# Altium PCB IOT_Speaker-PCB-v1.3.PcbDoc (part 3 of 3)
Units mm, origin at the board's own origin, x right, y up, seen from the top; angles counter-clockwise.
Board outline 61.96 x 67.79 mm, 2 copper layers (Top Layer, Bottom Layer), stack 1.57 mm thick; 111 components, 61 nets, 362 pads, 148 vias.
Unrouted connection lines stored in the file: 20.
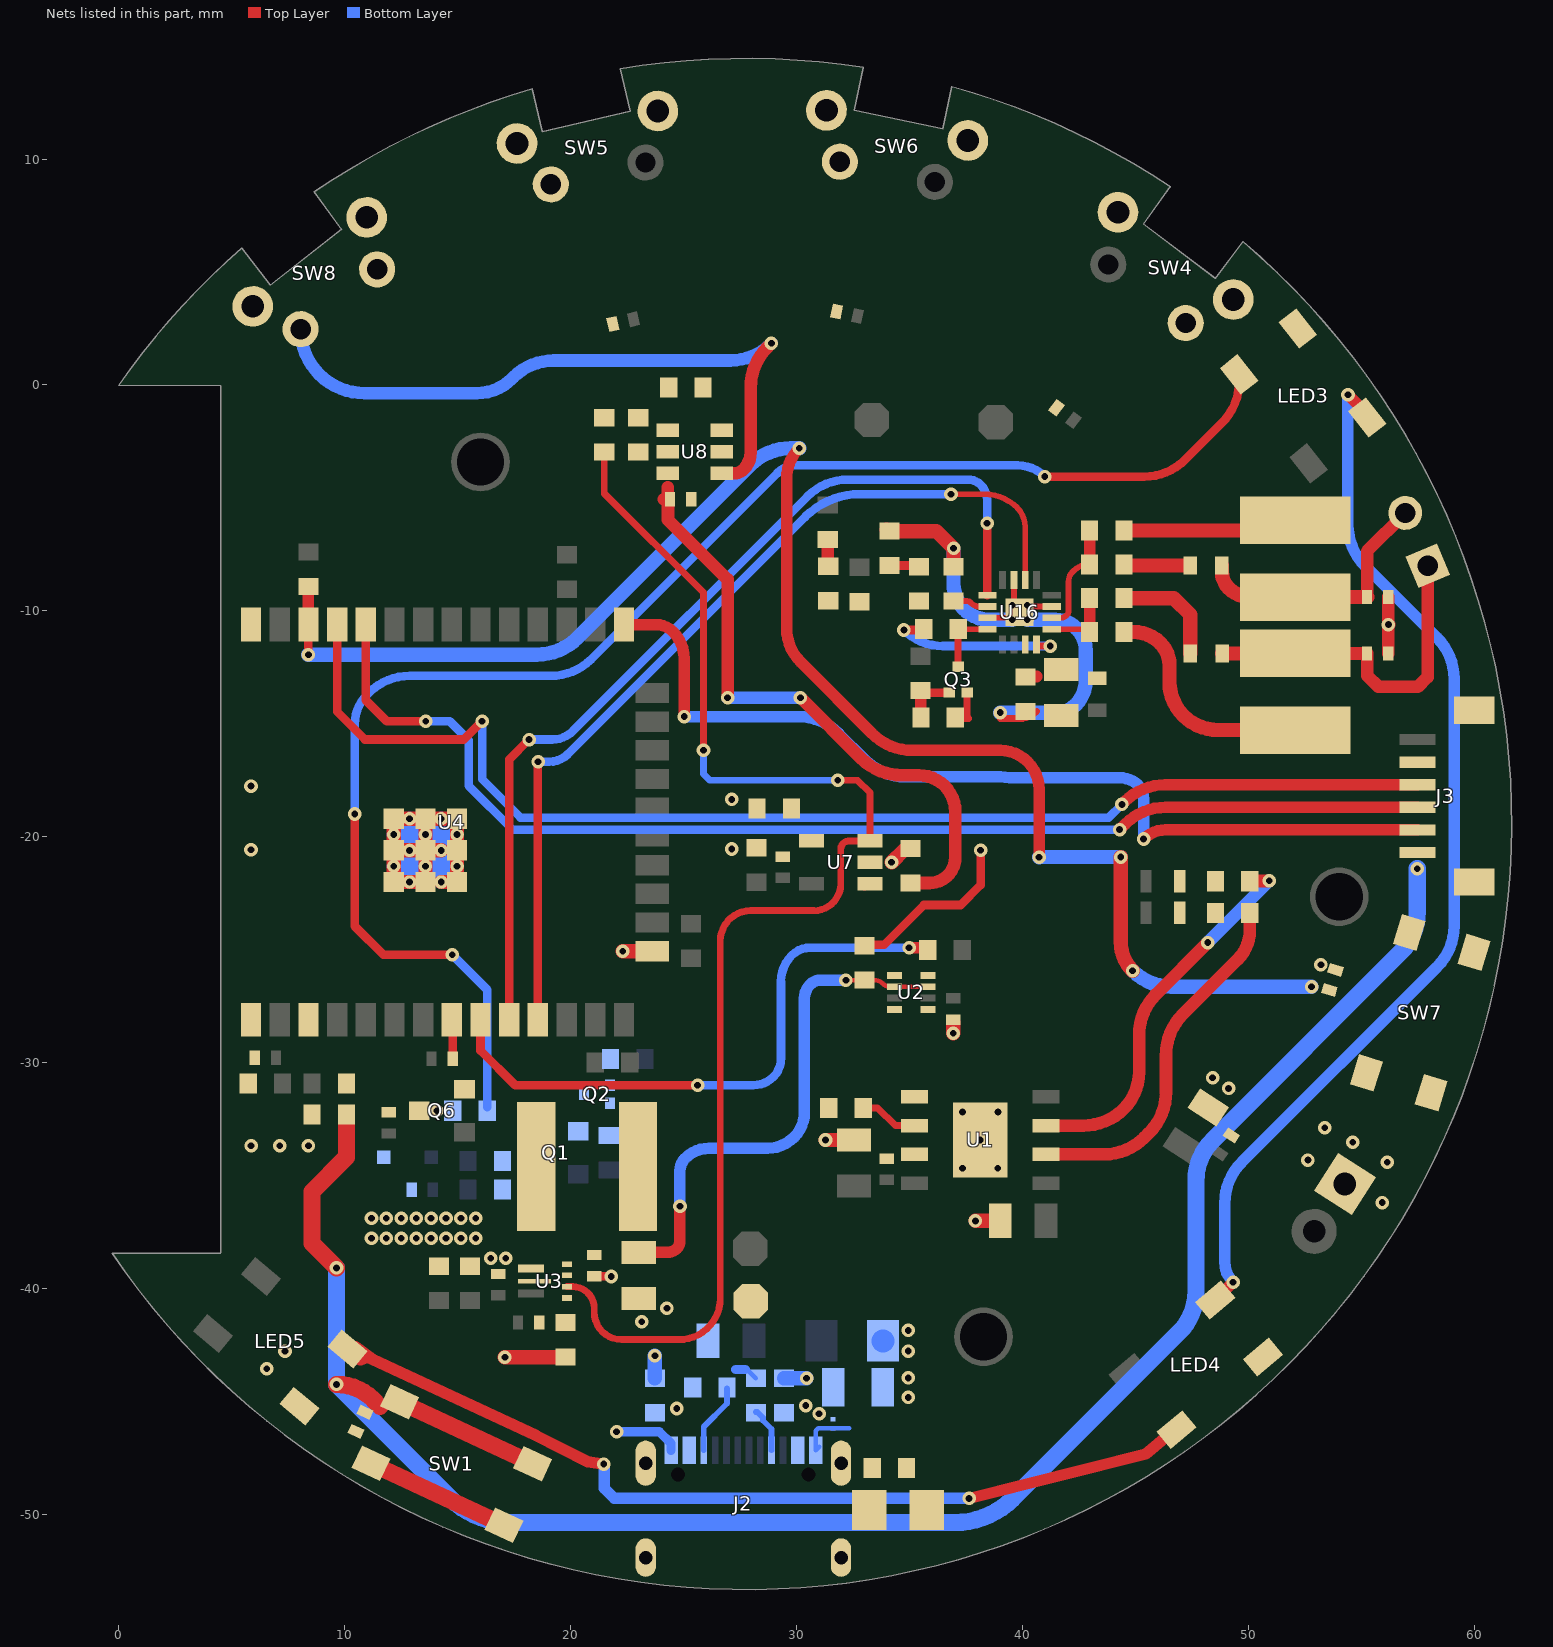
[diagram p2: the nets of this part, all layers, seen from the top]

## Via types
v1: diameter 0.6, hole 0.3, Top Layer to Bottom Layer, tented both sides, 130 vias
v2: diameter 0.6, hole 0.3, Top Layer to Bottom Layer, 18 vias

## Nets (pads, with @x,y where several pads share a name; then routed paths per layer and width w, separated by ;. In a path a pad name is that pad's centre, name@x,y a point inside that pad or via, vN(x,y) a via of type N, cw(c..) or ccw(c..) an arc to the next point about the centre after c; other vN are vias at no path point) (continued)
BUTTON_4: C22.1 R22.1 SW7.1 SW7.2 U4.36 | length 71.1
  Top Layer w0.381: v1(8.389,-11.939) U4.36@8.389,-10.608
  Top Layer w0.508: U4.36@8.39,-10.605 R22.1@8.389,-8.917 ; v1(30.12,-2.799) ccw(c31.461,-4.14) v1(30.12,-2.799) ccw(c31.461,-4.14) 29.565,-4.14 29.565,-10.77 ccw(c31.685,-10.77) 30.185,-12.269 33.353,-15.437 ccw(c35.149,-13.641) 35.149,-16.181 39.023,-16.181 cw(c39.023,-17.899) 40.742,-17.899 v1(40.742,-20.904)
  Top Layer w0.635: U4.36@8.389,-10.608 U4.36@8.391,-10.606 ; v1(44.355,-20.901) 44.355,-24.663 ccw(c46.152,-24.663) v1(44.882,-25.933)
  Bottom Layer w0.635: v1(8.389,-11.939) 18.505,-11.939 ccw(c18.505,-9.399) 20.301,-11.195 27.953,-3.543 cw(c29.749,-5.339) 29.749,-2.799 v1(30.12,-2.799) ; v1(40.742,-20.904) 40.745,-20.901 v1(44.355,-20.901) ; v1@44.883,-25.934 ccw(c46.586,-24.23) 46.586,-26.639 v1(52.803,-26.639)
CHRG: R4.2 U1.7 | length 17.1
  Top Layer w0.559: U1.7@41.041,-32.793 42.694,-32.793 ccw(c42.694,-30.253) 44.49,-32.049 ccw(c42.852,-30.411) 45.168,-30.411 45.168,-28.782 cw(c47.708,-28.782) 45.912,-26.986 v1(48.209,-24.689) ; R4.2@50.031,-21.96 v1@50.929,-21.96
  Bottom Layer w0.559: v1(48.209,-24.689) 48.209,-24.681 50.929,-21.961 v1(50.929,-21.953)
DATA_IN: U4.10 U16.1 | length 42.4
  Top Layer w0.381: U4.10@17.281,-28.106 17.281,-16.578 v1(18.161,-15.697) ; v1(38.437,-6.123) 38.444,-6.129 38.444,-9.303 U16.1@38.45,-9.309
  Bottom Layer w0.381: v1(18.161,-15.697) 19.191,-15.697 ccw(c19.191,-14.424) 20.091,-15.325 ; 20.092,-15.324 30.482,-4.934 cw(c32.278,-6.73) 32.278,-4.19 37.6,-4.19 cw(c37.6,-4.979) 38.158,-4.421 cw(c37.483,-5.095) 38.437,-5.095 v1(38.437,-6.123)
DETECTION: R6.2 U2.8 U4.9 | length 26.8
  Top Layer w0.381: U4.9@16.011,-28.106 16.011,-29.466 17.545,-31 v1(25.622,-31)
  Top Layer w0.508: v1(34.983,-24.919) 35.807,-24.919 R6.2@35.815,-24.911
  Bottom Layer w0.381: v1(25.622,-31) 28.093,-31 ccw(c28.093,-29.744) 28.981,-30.632 ccw(c28.184,-29.835) 29.312,-29.835 29.312,-26.413 cw(c30.959,-26.413) 29.794,-25.248 cw(c30.608,-26.061) 30.608,-24.911 34.975,-24.911 v1(34.983,-24.919)
DIN: Q6.2 R26.2 U4.8 | length 2
  Top Layer w0.203: U4.8@14.741,-28.106 U4.8@14.779,-28.144
  Top Layer w0.381: U4.8@14.741,-28.106 U4.8@14.741,-27.806 ; R26.2@14.779,-29.824 U4.8@14.779,-28.144
DIN#: LED3.4 R28.2 | length 67.8
  Top Layer w0.381: v1(10.446,-18.994) 10.446,-23.959 11.709,-25.222 v1(14.759,-25.222) ; v1(40.991,-4.057) 45.404,-4.057 ccw(c45.404,-1.517) 47.2,-3.313 48.849,-1.663 ccw(c47.053,0.133) 49.593,0.133 LED3.4@49.593,0.47
  Bottom Layer w0.381: v1(10.446,-18.994) 10.446,-15.005 cw(c12.268,-15.005) 10.98,-13.717 11.074,-13.623 cw(c12.87,-15.419) 12.87,-12.879 19.123,-12.879 ccw(c19.123,-10.339) 20.919,-12.135 29.159,-3.895 cw(c29.97,-4.705) 29.97,-3.559 39.79,-3.559 cw(c39.79,-5.258) v1(40.991,-4.057) ; v1(14.759,-25.222) 16.309,-26.772 R28.2@16.309,-31.978
DOUT1: LED3.2 LED4.4 | length 47.8
  Top Layer w0.508: LED4.4@48.492,-40.468 cw(c46.699,-42.267) 48.495,-40.471 LED4.4@48.537,-40.513 v1@49.303,-39.748 ; v1(54.416,-0.428) 55.163,-1.175 cw(c54.901,-1.438) LED3.2@55.272,-1.438 LED3.2@55.389,-1.555
  Bottom Layer w0.508: v1(49.328,-39.722) cw(c50.209,-38.841) 48.963,-38.841 48.963,-36.213 cw(c51.503,-36.213) 49.707,-34.417 58.368,-25.756 ccw(c56.572,-23.96) 59.112,-23.96 59.112,-12.997 ccw(c56.572,-12.997) 58.368,-11.201 55.16,-7.992 cw(c56.956,-6.196) 54.416,-6.196 v1(54.416,-0.428)
DOUT2: LED4.2 LED5.4 | length 40.9
  Top Layer w0.508: LED5.4@10.53,-42.969 LED5.4@10.12,-42.686 10.474,-42.581 11.216,-43.131 11.218,-43.133 ; 10.695,-43.168 11.031,-43.046 11.218,-43.133 ; 11.221,-43.135 11.218,-43.133 ; v1(21.463,-47.777) 20.759,-47.677 18.457,-46.508 11.218,-43.133 ; v1(37.643,-49.295) 45.463,-47.322 46.41,-46.528 LED4.2@46.828,-46.255
  Bottom Layer w0.508: v1(21.463,-47.777) 21.481,-47.795 21.481,-48.836 21.939,-49.295 v1(37.643,-49.295)
ENA: C14.2 C15.2 J3.6 R18.1 SW1.3 SW1.4 U4.3 | length 89.4
  Top Layer w0.508: U4.3@8.391,-28.106 U4.3@8.4,-28.097
  Top Layer w0.762: v1(9.634,-39.089) 8.547,-38.002 8.547,-35.716 10.071,-34.192 C14.2@10.071,-32.297 ; v1@9.635,-44.248 cw(c9.634,-46.547) 11.259,-44.921 11.561,-45.223 ; SW1.4@12.399,-44.992 SW1.4@12.427,-45.02 SW1.3@18.319,-47.767
  Bottom Layer w0.762: v1(9.634,-39.089) v1(9.634,-44.248) 14.681,-49.295 ccw(c17.271,-46.705) 17.271,-50.368 36.997,-50.368 ccw(c36.997,-46.705) 39.588,-49.295 46.939,-41.944 ccw(c45.143,-40.148) 47.683,-40.148 47.683,-35.233 cw(c50.223,-35.233) 48.427,-33.437 56.743,-25.121 ccw(c54.947,-23.325) 57.487,-23.325 v1(57.487,-21.413)
ENABLE: R10.2 U3.5 U7.3 | length 60.8
  Top Layer w0.305: U3.5@19.844,-39.922 20.093,-39.922 cw(c20.093,-40.873) 21.044,-40.873 21.044,-41.053 ccw(c22.257,-41.053) 22.257,-42.267 24.797,-42.267 ccw(c24.797,-40.438) 26.626,-40.438 26.626,-24.616 cw(c27.967,-24.616) 27.967,-23.275 30.772,-23.275 ccw(c30.772,-22.086) 31.575,-22.962 ccw(c30.772,-22.086) 31.826,-22.635 ccw(c30.772,-22.086) 31.96,-22.086 31.96,-20.562 cw(c32.339,-20.562) 32.339,-20.184 U7.3@33.26,-20.184 33.26,-18.051 32.71,-17.501 v1(31.826,-17.501) ; R10.2@21.488,-2.972 21.488,-4.8 25.883,-9.194 v1(25.883,-16.176)
  Bottom Layer w0.305: v1(25.883,-16.176) 25.883,-17.222 26.161,-17.501 v1(31.826,-17.501)
GAIN: R36.1 R37.1 R38.1 R39.1 U16.2 | length 1.8
  Top Layer w0.254: R36.1@36.954,-9.567 37.553,-9.567 cw(c37.553,-9.775) 37.701,-9.628 37.729,-9.656 ccw(c38.099,-9.287) 38.099,-9.809 U16.2@38.45,-9.809
  Top Layer w0.381: R38.1@31.264,-9.592 cw(c31.326,-9.654) R38.1@31.326,-9.567
  Top Layer w0.508: R38.1@31.407,-9.551 ccw(c31.507,-9.451) R38.1@31.507,-9.592 ; R37.1@32.788,-9.592 cw(c32.85,-9.654) R37.1@32.85,-9.567
GND: C1.1 C2.1 C3.1 C4.2 C5.1 C6.1 C7.1 C9.1 C10.1 C11.1 C12.2 C13.1 C14.1 C15.1 C16.1 C17.1 C18.1 C19.2 C20.1 C21.2 C22.2 C23.1 C24.2 C25.1 C26.1 C74.1 C75.1 C76.1 C77.1 C78.1 C79.1 C83.1 C102.1 C103.1 D1.2 D2.1 J1.1 J2.A1/B12 J2.B1/A12 J3.2 J3.MP1 J3.MP2 LED3.3 LED4.3 LED5.3 P3.1 Q2.2 Q3.2 R1.1 R2.1 R5.1 R8.1 R12.2 R36.2 R54.1 R66.2 R69.1 SW1.1 SW1.2 SW4.1 SW4.SH1 SW4.SH2 SW5.2 SW5.SH1 SW5.SH2 SW6.2 SW6.SH1 SW6.SH2 SW7.3 SW7.4 SW8.1 SW8.SH1 SW8.SH2 U1.1 U1.3 U1.9 U2.1 U2.4 U2.5 U3.1 U3.6 U4.1 U4.15 U4.38 U4.39 U4.39_16 U4.40 U4.41 U4.42 U4.43 U4.44 U4.45 U4.46 U4.47 U7.2 U8.2 U8.3 U16.3 U16.11 U16.15 U16.17 | length 86
  Top Layer w0.254: U16.3@38.45,-10.309 U16.17@39.555,-10.309 ; U16.17@39.625,-9.456 U16.15@39.625,-8.634 ; U16.17@40.478,-9.809 U16.11@41.3,-9.809
  Top Layer w0.305: R12.2@37.03,-14.774 37.624,-14.774 cw(c37.787,-14.611) 37.557,-14.611 Q3.2@37.557,-13.622 ; v1@39.021,-14.774 39.84,-14.774 ccw(c39.84,-13.646) 40.637,-14.444 ; U16.17@39.504,-9.755 cw(c39.504,-9.915) 39.617,-9.801 U16.17@39.875,-10.059
  Top Layer w0.381: C18.1@21.038,-39.46 21.044,-39.466 21.787,-39.466 v1(21.793,-39.472) ; C74.1@33.046,-24.79 33.876,-24.79 35.644,-23.022 37.27,-23.022 38.151,-22.141 v1@38.151,-20.599
  Top Layer w0.508: C74.1@33.01,-24.826 C74.1@33.046,-24.79
  Top Layer w0.559: C10.1@56.202,-11.888 56.202,-10.649 56.232,-10.619 56.232,-10.597 56.202,-10.567 C11.1@56.202,-9.389
  Top Layer w0.635: U4.39_16@14.271,-22.006 U4.45@14.971,-22.006 U4.39_16@14.971,-21.306 U4.47@14.971,-19.206 U4.39_16@14.271,-19.206 U4.44@13.571,-19.206 ; U4.39_16@14.271,-20.606 U4.43@13.571,-20.606 ; v1(17.089,-43.046) R8.1@19.751,-43.046 ; v1@22.301,-25.066 U4.15@23.611,-25.066 ; v1(31.284,-33.428) C5.1@32.544,-33.428 ; R66.2@33.982,-6.404 34.046,-6.468 36.192,-6.468 v1(36.954,-7.23) R36.2@36.954,-8.043 ; v1(34.212,-21.134) 34.758,-20.588 34.975,-20.588 C75.1@35.038,-20.524 ; v1(36.936,-28.702) C7.1@36.936,-28.213 ; v1(37.922,-37.009) C6.1@39.021,-37.009 ; U4.40@12.171,-20.606 U4.43@13.571,-20.606 ; U4.40@12.171,-20.606 U4.41@12.171,-19.206 U4.44@13.571,-19.206 ; U4.40@12.171,-20.606 U4.39@12.171,-22.006 U4.39_16@12.871,-22.006 U4.42@13.571,-22.006 U4.43@13.571,-20.606 ; U4.43@13.571,-20.606 U4.44@13.571,-19.206
  Top Layer w0.762: SW1.1@11.16,-47.739 SW1.2@17.051,-50.486
  Bottom Layer w0.203: 27.734,-43.508 R1.1@28.201,-43.976 ; J2.A1/B12@31,-47.013 J2.A1/B12@30.848,-47.166 30.848,-46.303 30.967,-46.184 32.344,-46.184
  Bottom Layer w0.406: v1(22.035,-46.342) 23.922,-46.342 24.448,-46.868 J2.B1/A12@24.448,-47.166 ; 27.313,-43.584 27.734,-43.584
  Bottom Layer w0.635: U4.39_16@12.171,-21.306 12.871,-21.306 ; U4.39_16@12.171,-19.906 12.871,-19.906 ; U4.39_16@12.871,-22.006 12.871,-21.306 ; U4.39_16@12.871,-19.206 12.871,-19.906 ; U4.39_16@14.271,-22.006 14.271,-21.306 14.271,-19.906 ; U4.39_16@14.271,-19.206 14.271,-19.906 ; U4.39_16@14.971,-21.306 12.871,-21.306 ; U4.39_16@14.971,-19.906 14.271,-19.906 ; C4.2@23.731,-43.976 v1(23.731,-42.978) ; C12.2@29.446,-43.976 v1(30.446,-43.976) ; v1(36.954,-7.23) 36.954,-8.8 ccw(c38.545,-8.8) 38.474,-10.39 v1(39.555,-10.39) ; v1(39.021,-14.505) 41.552,-14.505 ccw(c41.552,-13.377) 42.349,-14.174 ccw(c41.245,-13.071) 42.806,-13.071 42.806,-11.732 ccw(c41.467,-11.732) 42.414,-10.785 ccw(c41.46,-11.739) 41.46,-10.39 v1(40.215,-10.39) ; 12.871,-21.306 U4.39_16@12.871,-20.606 12.871,-19.906 ; 12.871,-19.906 14.271,-19.906
  other v1: 6.543,-43.551 7.352,-42.785 23.146,-41.479 24.264,-40.873 55.938,-36.196 37.352,-34.681 38.913,-34.681 56.154,-34.414 52.643,-34.319 5.851,-33.682 7.121,-33.682 8.391,-33.682 54.63,-33.525 38.132,-33.428 53.386,-32.89 37.345,-32.183 38.92,-32.183 49.131,-31.145 48.42,-30.674 53.218,-25.673 22.303,-25.066 38.152,-20.598 5.849,-20.575 27.132,-20.544 27.132,-18.347 5.849,-17.756 56.207,-10.608 39.555,-9.755 40.215,-9.755
  other v2: 16.463,-38.666 17.124,-38.666 11.184,-37.777 11.84,-37.777 12.501,-37.777 13.161,-37.777 13.822,-37.777 14.482,-37.777 15.142,-37.777 15.803,-37.777 11.184,-36.888 11.84,-36.888 12.501,-36.888 13.161,-36.888 13.822,-36.888 14.482,-36.888 15.142,-36.888 15.803,-36.888
IO0: J3.5 U4.25 | length 42
  Top Layer w0.508: U4.25@22.361,-10.606 23.77,-10.606 cw(c23.77,-11.684) 24.532,-10.922 cw(c23.341,-12.113) 25.026,-12.113 v1(25.026,-14.682) ; v1(45.368,-20.101) cw(c46.341,-21.074) 45.372,-20.098 cw(c46.341,-21.074) 46.341,-19.698 J3.5@57.487,-19.698
  Bottom Layer w0.508: v1(25.026,-14.682) 30.065,-14.682 cw(c30.065,-17.222) 31.861,-15.426 33.041,-16.605 ccw(c34.837,-14.809) 34.837,-17.349 39.029,-17.349 cw(c39.029,-19.889) 39.432,-17.382 44.281,-17.382 cw(c44.281,-18.624) 45.043,-17.643 cw(c44.281,-18.624) 45.159,-17.746 ; 45.112,-17.701 cw(c44.493,-18.319) 45.368,-18.319 v1(45.368,-20.101)
LRCLK: U4.11 U16.14 | length 40.8
  Top Layer w0.254: v1(36.839,-4.833) 38.315,-4.833 cw(c38.315,-6.898) 39.775,-5.437 cw(c38.93,-6.282) 40.125,-6.282 U16.14@40.125,-8.634
  Top Layer w0.381: U4.11@18.551,-28.106 v1@18.551,-16.688
  Top Layer w0.508: v1@18.551,-16.688 v1(18.557,-16.682)
  Bottom Layer w0.381: v1(18.557,-16.682) 19.048,-16.682 ccw(c19.048,-15.495) 19.888,-16.335 30.38,-5.842 ; 30.38,-5.842 cw(c32.818,-8.28) 32.818,-4.833 v1(36.839,-4.833)
NetC10_2: C10.2 FB2.2 J9.1 L2.2 | length 15.4
  Top Layer w0.559: L2.2@52.087,-11.878 52.097,-11.888 C10.2@55.262,-11.888 55.262,-12.864 55.76,-13.362 57.513,-13.362 57.946,-12.928 J9.1@57.946,-8.003
  Top Layer w0.635: FB2.2@48.84,-11.888 52.077,-11.888 L2.2@52.087,-11.878
NetC11_2: C11.2 FB3.2 J9.2 L3.2 | length 11.7
  Top Layer w0.559: C11.2@55.262,-9.389 55.262,-7.357 J9.2@56.954,-5.665
  Top Layer w0.635: FB3.2@48.836,-7.992 48.836,-8.271 ccw(c49.86,-8.271) 49.136,-8.995 ccw(c50.087,-8.045) 50.087,-9.389 L3.2@52.087,-9.389 C11.2@55.262,-9.389
NetC76_2: C76.2 U7.4
NetC102_2: C102.2 C103.2 FB1.2 R65.2 U16.7 U16.8 | length 8.2
  Top Layer w0.305: R65.2@35.597,-10.847 R65.2@35.633,-10.811 ; U16.8@40.625,-11.484 ccw(c40.803,-11.306) 40.803,-11.558 v1(41.231,-11.558)
  Top Layer w0.381: v1(34.754,-10.847) R65.2@35.597,-10.847
  Top Layer w0.508: 40.625,-12.891 ccw(c40.666,-12.891) 40.637,-12.92
  Bottom Layer w0.381: v1(34.754,-10.847) ccw(c36.471,-9.13) 36.471,-11.558 v1(41.231,-11.558)
NetF1_2: F1.2 FB7.1 | length 0
  Bottom Layer w1.016: FB7.1@33.822,-42.318 FB7.1@33.828,-42.324
  other v1: 34.95,-44.826 34.95,-43.961 34.95,-42.775 34.95,-41.859
NetFB2_1: FB2.1 R31.2 | length 5
  Top Layer w0.635: R31.2@44.498,-9.44 46.707,-9.44 47.44,-10.173 FB2.1@47.44,-11.888
NetFB3_1: FB3.1 R34.2 | length 2.8
  Top Layer w0.635: R34.2@44.498,-7.992 FB3.1@47.336,-7.992
NetJ2_A5: J2.A5 R1.2 | length 2
  Bottom Layer w0.254: R1.2@28.201,-45.467 28.265,-45.467 28.519,-45.721 28.519,-45.848 28.898,-46.227 J2.A5@28.898,-47.166
NetJ2_B5: J2.B5 R2.2 | length 3.2
  Bottom Layer w0.254: J2.B5@25.898,-47.166 25.898,-46.119 26.927,-45.091 R2.2@26.927,-44.426
NetL1_2: L1.2 U3.2
NetL2_1: L2.1 R32.2 | length 10.4
  Top Layer w0.635: R32.2@44.498,-10.938 44.918,-10.938 cw(c44.918,-12.621) 46.108,-11.431 cw(c45.127,-12.413) 46.515,-12.413 46.515,-13.162 ccw(c48.593,-13.162) 47.123,-14.632 ccw(c48.684,-13.071) 48.684,-15.278 L2.1@52.087,-15.278
NetL3_1: L3.1 R35.2 | length 7.8
  Top Layer w0.635: R35.2@44.498,-6.443 51.634,-6.443 L3.1@52.087,-5.989
NetLED1_2: LED1.2 R3.1
NetLED2_2: LED2.2 R4.1
NetQ1_1: Q1.1 Q2.3 R55.2
NetQ2_1: Q2.1 R56.2
NetQ3_1: Q3.1 R11.1 R12.1 | length 2.3
  Top Layer w0.381: R11.1@35.704,-13.622 Q3.1@36.757,-13.622
  Top Layer w0.508: R11.1@35.481,-13.58 cw(c35.419,-13.641) R11.1@35.506,-13.641 ; R12.1@35.506,-14.723 R11.1@35.506,-13.591
NetQ6_3: Q6.3 R27.2 R28.1 | length 0.8
  Top Layer w0.203: Q6.3@13.297,-32.132 v1(14.068,-32.132)
NetR5_2: R5.2 U1.2 | length 2.6
  Top Layer w0.305: R5.2@32.951,-32.005 33.588,-32.005 34.375,-32.793 U1.2@35.224,-32.793
NetR7_1: R7.1 R8.2 U3.4
NetR10_1: R10.1 R29.2 R30.2
NetR29_1: R29.1 U8.4
NetR30_1: R30.1 U8.5
NetR38_2: R38.2 R67.1 | length 1.3
  Top Layer w0.381: R38.2@31.239,-8.007 ccw(c31.326,-8.007) R38.2@31.264,-8.068
  Top Layer w0.559: R67.1@31.382,-6.843 31.382,-7.966 ccw(c31.469,-7.966) R38.2@31.407,-8.027
NetR39_2: R39.2 R66.1 | length 1.3
  Top Layer w0.381: R66.1@34.109,-7.992 35.307,-7.992 cw(c35.307,-8.165) R39.2@35.43,-8.043
NetSW8_2: SW8.2 U8.1 | length 30
  Top Layer w0.559: U8.1@26.698,-3.913 27.232,-3.913 ccw(c27.232,-3.308) 27.66,-3.736 ccw(c26.906,-2.981) 27.972,-2.981 27.972,-0.117 cw(c30.512,-0.117) 28.716,1.679 v1(28.89,1.853)
  Bottom Layer w0.559: SW8.2@8.045,2.472 ccw(c10.881,2.472) 10.881,-0.364 15.846,-0.364 ccw(c15.846,1.833) 17.399,0.279 17.461,0.342 cw(c19.257,-1.454) 19.257,1.086 27.071,1.086 ccw(c27.071,3.626) 28.867,1.83 v1(28.89,1.853)
OUTN: R34.1 R35.1 U16.10 | length 5
  Top Layer w0.254: U16.10@41.3,-10.309 41.671,-10.309 ccw(c41.671,-9.89) 41.968,-10.187 ccw(c41.784,-10.003) 42.044,-10.003 42.044,-8.708 ; 42.044,-8.707 cw(c42.659,-8.707) 42.224,-8.272 42.259,-8.237 cw(c42.974,-8.952) 42.72,-7.974 R34.1@42.974,-7.941
  Top Layer w0.508: R34.1@42.974,-7.941 R35.1@42.974,-6.443
OUTP: R31.1 R32.1 U16.9 | length 3.3
  Top Layer w0.254: U16.9@41.3,-10.809 42.845,-10.809 R32.1@42.974,-10.938
  Top Layer w0.508: R32.1@42.974,-10.938 42.974,-9.448 R31.1@42.974,-9.364
RXD: J3.4 U4.34 | length 53.8
  Top Layer w0.381: U4.34@10.931,-10.606 10.931,-13.953 11.862,-14.884 v1(13.589,-14.884)
  Top Layer w0.508: v1(44.305,-19.686) 44.549,-19.442 cw(c46.345,-21.238) 46.345,-18.698 J3.4@57.487,-18.698
  Bottom Layer w0.381: v1(13.589,-14.884) 14.648,-14.884 15.494,-15.73 15.494,-17.749 17.431,-19.686 v1(44.305,-19.686)
SD_MODE: Q3.3 R65.1 U16.4 | length 3
  Top Layer w0.254: R65.1@37.159,-10.809 U16.4@38.45,-10.809
  Top Layer w0.305: Q3.3@37.157,-12.522 R65.1@37.157,-10.811 R65.1@37.159,-10.809
SHELL: C79.2 J2.S1 J2.S2 J2.S3 J2.S4 R69.2
STDBY: R3.2 U1.6 | length 16.1
  Top Layer w0.559: U1.6@41.041,-34.063 43.608,-34.063 ccw(c43.608,-31.523) 45.404,-33.319 45.618,-33.105 ccw(c43.822,-31.309) 46.362,-31.309 46.362,-29.654 cw(c48.902,-29.654) 47.106,-27.858 49.546,-25.418 ccw(c48.279,-24.151) 50.07,-24.151 R3.2@50.07,-23.369
TXD: J3.3 U4.35 | length 56.3
  Top Layer w0.381: U4.35@9.661,-10.606 9.661,-14.461 10.897,-15.697 15.265,-15.697 v1(16.078,-14.884)
  Top Layer w0.508: v1(44.406,-18.569) 44.533,-18.442 cw(c46.329,-20.238) 46.329,-17.698 J3.3@57.487,-17.698
  Bottom Layer w0.381: v1(16.078,-14.884) 16.078,-17.45 17.781,-19.153 43.822,-19.153 v1(44.406,-18.569)
V_MON: Q1.3 R9.2
V_OR: C9.2 C16.2 C18.2 C74.2 C75.2 L1.1 U2.2 U2.7 U3.7 U7.1 U8.6 | length 51.2
  Top Layer w0.203: v1(32.189,-26.35) C74.2@33.01,-26.35 33.456,-26.35 cw(c33.456,-26.851) 33.81,-26.497 ccw(c34.172,-26.134) 34.172,-26.647 U2.2@34.344,-26.647 U2.7@35.824,-26.647
  Top Layer w0.381: U7.1@33.01,-22.193 33.119,-22.084 U7.1@33.26,-22.084
  Top Layer w0.508: C16.2@23.19,-38.235 C16.2@23.019,-38.406 24.284,-38.406 ccw(c24.284,-37.824) 24.696,-38.235 ccw(c24.345,-37.885) 24.841,-37.885 v1(24.841,-36.357)
  Top Layer w0.559: 24.124,-5.055 24.187,-5.055 24.313,-5.18 24.313,-5.971 26.949,-8.607 v1(26.949,-13.843) ; 24.298,-4.536 24.298,-5.055 C9.2@24.313,-5.069 ; v1(30.175,-13.843) 32.867,-16.535 ccw(c34.663,-14.739) 34.212,-17.238 ccw(c34.663,-14.739) 34.663,-17.279 35.417,-17.279 cw(c35.417,-18.891) 37.03,-18.891 37.03,-20.905 cw(c35.887,-20.905) 36.941,-21.347 cw(c35.887,-20.905) 36.329,-21.959 cw(c35.887,-20.905) 36.309,-21.968 cw(c35.887,-20.905) 35.887,-22.048 C75.2@35.038,-22.048
  Bottom Layer w0.508: v1(24.841,-36.357) 24.841,-34.791 cw(c25.622,-34.791) 25.07,-34.239 cw(c26.14,-35.309) 26.14,-33.796 28.697,-33.796 ccw(c28.697,-32.1) 29.896,-33.299 ccw(c28.792,-32.196) 30.353,-32.196 30.353,-27.158 cw(c31.222,-27.158) 30.608,-26.543 cw(c31.074,-27.009) 31.074,-26.35 v1(32.189,-26.35)
  Bottom Layer w0.559: v1(26.949,-13.843) v1(30.175,-13.843)
VUSB: C4.1 C12.1 D1.1 F1.1 J2.A4/B9 J2.B4/A9
  other v1: 31,-45.543 24.696,-45.315 30.411,-45.188
pads on no net: J2.A6 J2.A7 J2.A8 J2.B6 J2.B7 J2.B8 J2.MH LED5.2 U4.4 U4.5 U4.6 U4.14 U4.17 U4.18 U4.19 U4.20 U4.21 U4.22 U4.23 U4.24 U4.26 U4.29 U4.30 U4.31 U4.32 U4.37 U16.5 U16.6 U16.12 U16.13

## Polygon pours and split planes (outlines as drawn)
GND on Bottom Layer "NONET_L-01_P-001" (solid, pour order 0): 4.487,-38.441 4.499,-38.429 4.499,-0.027 0,0 cw(c27.77,-19.437) 5.433,6.058 6.706,4.429 9.858,6.892 8.648,8.55 cw(c27.77,-19.437) 18.3,13.109 18.735,11.222 22.633,12.122 22.2,13.998 cw(c27.77,-19.437) 32.959,14.06 32.557,12.169 36.47,11.337 36.869,13.215 cw(c27.77,-19.437) 46.551,8.781 45.364,7.124 48.542,4.721 49.772,6.348 cw(c27.77,-19.437) -0.298,-38.441
GND on Top Layer "NONET_L-01_P-001" (solid, pour order 1): 4.487,-38.441 4.499,-38.429 4.499,-0.027 0,0 cw(c27.77,-19.437) 5.433,6.058 6.706,4.429 9.858,6.892 8.648,8.55 cw(c27.77,-19.437) 18.3,13.109 18.735,11.222 22.633,12.122 22.2,13.998 cw(c27.77,-19.437) 32.959,14.06 32.557,12.169 36.47,11.337 36.869,13.215 cw(c27.77,-19.437) 46.551,8.781 45.364,7.124 48.542,4.721 49.772,6.348 cw(c27.77,-19.437) -0.298,-38.441

## Other copper
Top Layer:
  region net SHELL: 22.873,-46.634 22.873,-47.736 32.423,-47.736 32.423,-46.634
  region net SHELL: 22.873,-51.542 22.873,-52.634 32.423,-52.634 32.423,-51.542
  rectangle net SHELL: 22.795,-52.603 23.887,-46.634
  rectangle net SHELL: 31.445,-52.316 34.112,-46.634
  region net BUTTON_4: 56.589,-27.955 56.725,-27.509 53.354,-26.479 53.218,-26.924
  rectangle net GND: 5.29,-34.215 6.382,-9.856
  region net BUTTON_3: 20.32,-11.354 20.32,-8.661 19.355,-8.661 19.355,-11.354
  rectangle net 5V_BOOST: 42.768,-15.596 43.815,-14.016
  rectangle net V_OR: 31.575,-23.989 33.455,-23.368
  rectangle net V_OR: 32.701,-23.989 33.455,-21.671
  rectangle net V_OR: 31.575,-26.731 32.189,-23.547
  rectangle net V_OR: 23.798,-5.46 24.798,-3.613
  rectangle net 5V_BOOST: 11.633,-33.456 12.268,-32.809
  rectangle net NetQ6_3: 11.633,-32.542 14.327,-31.592
  rectangle net DIN: 14.55,-31.592 16.039,-30.65
  rectangle net DIN: 14.525,-31.592 15.246,-29.507
  region net GAIN: 37.421,-9.157 30.884,-9.157 30.884,-10.06 37.421,-10.06
  region net BATT: 47.03,-32.395 44.157,-35.819 46.227,-37.557 49.1,-34.133
  rectangle net 5V_BOOST: 30.848,-5.894 33.296,-4.98
  rectangle net 5V_BOOST: 32.289,-8.485 33.296,-5.027
  rectangle net 3.3V: 55.034,-16.176 58.287,-15.126
  rectangle net ENA: 56.687,-21.998 58.287,-20.448
  region net NetF1_2: 35.585,-45.238 35.585,-41.368 34.163,-41.368 34.163,-45.238
  region net 5V: 45.938,-21.472 44.907,-21.472 44.907,-25.095 45.938,-25.095
  region net BUTTON_4: 53.896,-27.379 54.124,-26.632 52.502,-26.136 52.273,-26.883
  rectangle net BUTTON_3: 18.551,-9.475 20.314,-8.663
  rectangle net 3.3V: 19.286,-8.129 21.091,-6.909
  rectangle net 3.3V: 7.798,-7.901 9.661,-6.706
  rectangle net GND: 31.808,-34.482 35.824,-33.428
  region net BATT: 47.064,-32.358 46.159,-33.752 51.815,-37.425 52.72,-36.031
  region net BATT: 50.572,-34.642 48.579,-37.71 53.392,-40.836 55.385,-37.767
  rectangle net GND: 26.198,-3.263 27.198,-1.713
  region net BUTTON_4: 57.877,-23.739 56.809,-23.412 54.499,-30.967 55.568,-31.294
  rectangle net NetR29_1: 25.102,-2.313 25.623,0.342
  rectangle net NetR29_1: 25.102,-1.449 26.245,0.342
  rectangle net NetR29_1: 23.798,-2.313 25.623,-1.713
  rectangle net NetR10_1: 21.031,-1.449 24.721,-1.068
  rectangle net NetR10_1: 23.959,-1.449 24.721,0.342
  rectangle net NetR10_1: 20.955,-1.83 23.439,-1.068
  rectangle net NetR30_1: 22.55,-3.354 24.798,-2.592
  region net DOUT2: 9.148,-42.523 10.856,-43.956 11.696,-42.955 9.988,-41.522
  rectangle net GND: 22.257,-41.784 24.696,-39.905
  rectangle net V_OR: 22.133,-38.914 23.833,-31.746
  rectangle net NetL1_2: 17.633,-38.508 19.34,-31.746
  rectangle net NetL1_2: 19.044,-39.772 19.333,-31.746
  rectangle net GND: 5.341,-34.215 8.928,-31.853
  region net GND: 7.073,-45.15 10.535,-48.055 11.207,-47.253 7.746,-44.349
  rectangle net V_OR: 19.619,-39.047 20.424,-38.292
  rectangle net V_OR: 19.619,-38.749 23.781,-38.292
  rectangle net GND: 20.721,-39.689 21.356,-39.231
  rectangle net GND: 10.751,-39.587 17.444,-36.605
  rectangle net GND: 26.626,-21.134 28.633,-17.902
  rectangle net GND: 27.792,-21.109 29.712,-20.108
  rectangle net GND: 19.619,-39.547 21.356,-39.297
  rectangle net BATT: 27.203,-39.447 28.72,-26.997
  rectangle net GND: 13.304,-39.297 18.819,-38.947
  region net GND: 9.547,-47.594 11.562,-48.533 12.328,-46.89 10.313,-45.951
  region net ENA: 10.487,-45.578 12.502,-46.518 13.294,-44.818 11.28,-43.878
  rectangle net 5V_BOOST: 12.745,-40.54 18.819,-40.047
  rectangle net 5V_BOOST: 12.745,-41.828 17.901,-40.047
  rectangle net NetL1_2: 17.669,-39.772 19.34,-39.572
  rectangle net 5V: 36.618,-27.385 41.641,-26.443
  rectangle net DETECTION: 35.434,-26.297 36.159,-24.466
  rectangle net NetC76_2: 29.395,-19.191 31.21,-18.302
  rectangle net NetC76_2: 30.106,-20.484 31.21,-18.302
  rectangle net V_OR: 32.71,-22.429 35.483,-21.667
  rectangle net 3.3V: 6.671,-31.37 8.928,-30.481
  rectangle net 3.3V: 6.671,-31.37 7.627,-24.36
  rectangle net ENA: 7.941,-30.008 10.452,-29.149
  rectangle net ENA: 7.941,-29.783 8.841,-27.356
  rectangle net ENA: 9.69,-32.742 10.452,-29.149
  rectangle net NetR7_1: 18.384,-41.955 20.213,-41.066
  rectangle net NetR7_1: 19.4,-41.955 20.073,-40.297
  rectangle net 3.3V: 26.626,-22.526 31.21,-21.561
  rectangle net BATT: 27.203,-28.245 33.583,-26.997
  rectangle net BATT: 32.791,-27.297 34.679,-26.997
  rectangle net V_OR: 31.884,-26.731 32.878,-25.969
  rectangle net 5V: 35.489,-27.297 37.253,-26.997
  rectangle net 5V: 29.75,-37.593 35.824,-34.952
  rectangle net VUSB: 23.324,-46.229 30.848,-44.928
  rectangle net BATT: 40.441,-39.447 41.765,-35.033
  rectangle net BATT: 27.383,-39.447 41.765,-38.076
  rectangle net 5V: 38.132,-30.888 41.641,-26.443
  rectangle net 5V: 40.441,-31.823 41.641,-26.448
  rectangle net BATT: 40.441,-38.583 51.151,-35.033
  rectangle net GND: 37.269,-14.251 37.98,-13.336
  rectangle net NetLED1_2: 46.694,-23.869 48.948,-22.83
  rectangle net NetLED2_2: 46.694,-22.511 48.948,-21.472
  region net GND: 38.675,-15.285 38.675,-14.015 36.634,-14.015 36.634,-15.285
  region net GND: 42.501,-15.292 42.501,-14.022 37.243,-14.022 37.243,-15.292
  region net NetC102_2: 43.714,-13.336 43.714,-12.092 39.656,-12.092 39.656,-13.336
  rectangle net NetC102_2: 39.961,-13.336 41.638,-11.126
Bottom Layer:
  rectangle net GND: 27.503,-44.357 29.89,-43.407
  region net NetQ2_1: 22.113,-29.389 21.351,-29.389 21.351,-31.259 22.113,-31.259
  region net 5V: 38.645,-24.151 38.645,-25.307 45.905,-25.307 45.905,-24.151
  region net 5V: 41.283,-24.376 38.64,-24.376 38.64,-29.592 41.283,-29.592
  rectangle net NetQ6_3: 13.484,-32.577 15.166,-31.446
  region net 3.3V: 55.824,-16.358 55.824,-15.037 46.311,-15.037 46.311,-16.358
  rectangle net 5V_BOOST: 32.031,-40.792 35.306,-38.374
  rectangle net 5V_BOOST: 32.031,-39.447 43.8,-38.374
  region net GND: 53.372,-31.86 51.488,-34.76 55.617,-37.442 57.501,-34.541
  region net BATT: 51.248,-35.081 49.511,-37.756 53.647,-40.443 55.385,-37.767
  rectangle net VUSB: 29.349,-46.227 30.411,-45.02
  rectangle net VUSB: 29.001,-45.899 32.122,-45.061
  rectangle net NetJ2_A5: 27.757,-46.038 28.708,-45.086
  rectangle net VUSB: 29.001,-45.899 31.808,-44.839
  rectangle net BATT: 22.462,-32.894 28.677,-32.05
  rectangle net BATT: 22.462,-35.352 23.299,-32.056
  rectangle net BATT: 19.875,-35.346 23.299,-34.369
  rectangle net NetQ1_1: 19.875,-33.607 20.81,-31.142
  rectangle net NetQ1_1: 19.875,-33.607 22.131,-32.626
  rectangle net BAT_ADC: 13.533,-35.965 15.895,-33.827
  rectangle net 5V: 27.541,-38.181 35.237,-35.403
  rectangle net 5V: 27.541,-43.13 31.808,-35.622
  rectangle net 5V: 38.64,-30.913 41.279,-28.213
  rectangle net V_MON: 16.603,-34.936 18.795,-33.446
  rectangle net 5V: 32.646,-30.913 40.85,-29.185
  rectangle net 5V: 32.646,-38.181 35.237,-29.389
  rectangle net NetF1_2: 33.128,-45.225 35.465,-41.408
  rectangle net 5V: 27.515,-42.339 31.808,-38.533
  rectangle net VUSB: 31.122,-45.867 32.122,-43.525
  rectangle net VUSB: 23.096,-45.975 25.548,-45.035
  rectangle net VUSB: 24.948,-47.766 25.548,-45.67
  rectangle net VUSB: 29.748,-47.766 30.348,-45.086
  rectangle net GND: 39.25,-10.695 40.596,-9.348

## Silkscreen, mask and mechanical layers (free items; w line width, h text height)
Top Overlay:
  lines w0.127: 4.929,-31.972 4.929,-30.189 5.239,-29.743 5.646,-29.741 ; 7.729,-33.456 7.729,-31.459 ; 45.407,-11.011 45.688,-11.011 46.108,-11.431 46.108,-14.867 ; 45.923,-14.681 46.108,-14.867 ; 46.293,-14.681 46.108,-14.867 ; 42.333,-11.658 45.127,-11.658 45.127,-5.74 42.333,-5.74 42.333,-11.658 ; 43.98,-21.133 47.513,-21.133 47.513,-15.158 43.98,-15.158 43.98,-21.133
  lines w0.254: 10.528,-30.926 10.758,-30.926 10.998,-31.166 10.998,-35.154 10.758,-35.394 ; 14.635,-41.929 15.295,-41.934 15.295,-41.158 ; 16.583,-41.078 16.765,-40.713 ; 17.406,-38.205 17.806,-38.605 ; 29.386,-22.622 29.39,-22.269 ; 49.446,-32.708 49.769,-32.191
  text "VOL-" at 29.88,9.799 h1.52 r78
  text "MUTE" at 26.74,9.783 h1.52 r103
  text "VOL+" at 41.019,6.321 h1.52 r52.9
  text "ON/OFF" at 7.673,-0.38 h1.52 r128
  text "5V_Boost" at 30.099,-0.535 h1.52
  text "3V3" at 37.245,-3.938 h1.52
  text "PROGRAM." at 56.478,-21.744 h1.52 r90
  text "CHARGING" at 37.458,-22.617 h1.52
  text "STANDBY" at 37.458,-23.989 h1.52
  text "BUTTON4" at 54.274,-30.614 h1.52 r73
  text "-VE" at 56.287,-32.686 h1.02 r147
  text "BATTERY" at 48.103,-38.522 h1.65 r57
  text "BATT" at 29.076,-38.895 h1.52
  text "+VE" at 52.141,-39.992 h1.02 r147
  text "GND" at 29.083,-41.199 h1.52
  text "RESET" at 13.637,-44.598 h1.4 r335
Bottom Overlay:
  drawing of 3090 lines, arcs and shapes, not listed
  text "ZERO CARBON FOOTPRINT" at 38.339,-15.876 h0.97
  text "USB" at 23.241,-50.392 h1.52
Dimension:
  circle w0.127: c-5.182,108.306 r0.064
  lines w0.254: -5.182,116.041 -5.182,108.306 -1.314,108.306
Board Outline:
  circle w0.254: c38.278,-42.139 r1.05
  circle w0.254: c54.026,-22.657 r1.05
  circle w0.254: c16.009,-3.408 r1.05
  lines w0.013: 4.499,-0.027 0,0 4.518,0 ; 9.122,13.622 9.135,13.632
  lines w0.127: 4.487,-38.441 4.499,-38.429
  lines w0.254: 4.487,-38.441 -0.298,-38.441 ccw(c27.77,-19.437) 49.772,6.348 48.542,4.721 45.364,7.124 46.551,8.781 ccw(c27.77,-19.437) 36.869,13.215 36.47,11.337 32.557,12.169 32.959,14.06 ccw(c27.77,-19.437) 22.2,13.998 22.633,12.122 18.735,11.222 18.3,13.109 ccw(c27.77,-19.437) 8.648,8.55 9.858,6.892 6.706,4.429 5.433,6.058 ccw(c27.77,-19.437) 0,0 4.499,-0.027 4.499,-38.429
Fabrication:
  drawing of 191 lines, arcs and shapes, not listed
  text "Layer" at 86.144,-14.148 h1.52
  text "Name" at 96.556,-14.148 h1.52
  text "Material" at 120.171,-14.148 h1.52
  text "Thickness" at 142.009,-14.148 h1.52
  text "Constant" at 158.515,-14.148 h1.52
  text "Board Layer Stack" at 172.99,-14.148 h1.52
  text "Top Overlay" at 96.556,-17.196 h1.52
  text "Top Solder" at 96.556,-20.244 h1.52
  text "Solder Resist" at 120.171,-20.244 h1.52
  text "0.010mm" at 142.009,-20.244 h1.52
  text "3.5" at 158.515,-20.244 h1.52
  text "1" at 86.144,-23.292 h1.52
  text "Top Layer" at 96.556,-23.292 h1.52
  text "0.035mm" at 142.009,-23.292 h1.52
  text "Dielectric 1" at 96.556,-26.34 h1.52
  text "FR-4" at 120.171,-26.34 h1.52
  text "1.500mm" at 142.009,-26.34 h1.52
  text "4.8" at 158.515,-26.34 h1.52
  text "2" at 86.144,-29.388 h1.52
  text "Bottom Layer" at 96.556,-29.388 h1.52
  text "0.035mm" at 142.009,-29.388 h1.52
  text "Bottom Solder" at 96.556,-32.436 h1.52
  text "Solder Resist" at 120.171,-32.436 h1.52
  text "0.010mm" at 142.009,-32.436 h1.52
  text "3.5" at 158.515,-32.436 h1.52
  text "Bottom Overlay" at 96.556,-35.484 h1.52
  text "Total board thickness:" at 86.144,-38.532 h1.52
  text "1.590mm" at 142.009,-38.532 h1.52
Drill Drawing:
  circle w0.254: c86.147,18.651 r0.508
  circle w0.254: c86.147,18.651 r0.847
  lines w0.254: 85.301,2.564 86.147,2.987 86.994,2.564 86.571,3.411 86.994,4.257 86.147,3.834 85.301,4.257 85.724,3.411 85.301,2.564 ; 85.301,8.067 86.994,8.067 86.147,6.374 85.301,8.067 ; 85.301,11.031 86.147,10.184 86.994,11.031 86.147,11.877 85.301,11.031 ; 85.301,13.994 86.994,13.994 86.994,15.687 85.301,15.687 85.301,13.994 ; 85.301,23.307 86.994,23.307 86.147,21.614 85.301,23.307 ; 85.301,25.847 85.724,25.847 86.147,25.424 86.571,25.847 86.994,25.847 86.571,26.271 86.994,26.694 86.571,26.694 86.147,27.117 85.724,26.694 85.301,26.694 85.724,26.271 85.301,25.847 ; 85.639,22.969 86.655,22.969 86.147,21.953 85.639,22.969 ; 85.639,26.017 85.893,26.017 86.147,25.763 86.401,26.017 86.655,26.017 86.401,26.271 86.655,26.525 86.401,26.525 86.147,26.779 85.893,26.525 85.639,26.525 85.893,26.271 85.639,26.017
  lines w0.381: 83.782,1.421 425.874,1.421 ; 83.782,28.091 425.874,28.091 ; 97.774,-2.389 97.774,31.901 ; 112.756,-2.389 112.756,31.901 ; 140.688,-2.389 140.688,31.901 ; 153.537,-2.389 153.537,31.901 ; 172.176,-2.389 172.176,31.901 ; 210.264,-2.389 210.264,31.901 ; 225.247,-2.389 225.247,31.901 ; 244.19,-2.389 244.19,31.901 ; 273.137,-2.389 273.137,31.901 ; 294.823,-2.389 294.823,31.901 ; 328.697,-2.389 328.697,31.901 ; 362.57,-2.389 362.57,31.901 ; 390.248,-2.389 390.248,31.901 ; 83.782,-2.389 425.874,-2.389 425.874,31.901 83.782,31.901 83.782,-2.389
  text "Symbol" at 86.068,29.234 h1.83
  text "Count" at 98.917,29.234 h1.83
  text "Hole Size" at 113.899,29.234 h1.83
  text "Plated" at 141.831,29.234 h1.83
  text "Hole Type" at 154.68,29.234 h1.83
  text "Drill Layer Pair" at 173.319,29.234 h1.83
  text "Via/Pad" at 211.407,29.234 h1.83
  text "Pad Shape" at 226.39,29.234 h1.83
  text "Template" at 245.333,29.234 h1.83
  text "Description" at 274.28,29.234 h1.83
  text "Hole Tolerance (+)" at 295.966,29.234 h1.83
  text "Hole Tolerance (-)" at 329.84,29.234 h1.83
  text "Hole Length" at 363.713,29.234 h1.83
  text "Routed Path Length" at 391.391,29.234 h1.83
  text "2" at 98.917,25.424 h1.52
  text "0.600mm (23.62mil)" at 113.899,25.424 h1.52
  text "PTH" at 141.831,25.424 h1.52
  text "Slot" at 154.68,25.424 h1.52
  text "Top Layer - Bottom Layer" at 173.319,25.424 h1.52
  text "Pad" at 211.407,25.424 h1.52
  text "Rounded" at 226.39,25.424 h1.52
  text "r90_170h60_140r100" at 245.333,25.424 h1.52
  text "1.400mm (55.12mil)" at 363.713,25.424 h1.52
  text "0.800mm (31.50mil)" at 391.391,25.424 h1.52
  text "2" at 98.917,21.614 h1.52
  text "0.600mm (23.62mil)" at 113.899,21.614 h1.52
  text "PTH" at 141.831,21.614 h1.52
  text "Slot" at 154.68,21.614 h1.52
  text "Top Layer - Bottom Layer" at 173.319,21.614 h1.52
  text "Pad" at 211.407,21.614 h1.52
  text "Rounded" at 226.39,21.614 h1.52
  text "(Mixed)" at 245.333,21.614 h1.52
  text "1.700mm (66.93mil)" at 363.713,21.614 h1.52
  text "1.100mm (43.31mil)" at 391.391,21.614 h1.52
  text "2" at 98.917,17.804 h1.52
  text "0.620mm (24.41mil)" at 113.899,17.804 h1.52
  text "NPTH" at 141.831,17.804 h1.52
  text "Round" at 154.68,17.804 h1.52
  text "Top Layer - Bottom Layer" at 173.319,17.804 h1.52
  text "Pad" at 211.407,17.804 h1.52
  text "Rounded" at 226.39,17.804 h1.52
  text "c0hn62" at 245.333,17.804 h1.52
  text "-" at 363.713,17.804 h1.52
  text "-" at 391.391,17.804 h1.52
  text "3" at 98.917,13.994 h1.52
  text "2.100mm (82.68mil)" at 113.899,13.994 h1.52
  text "NPTH" at 141.831,13.994 h1.52
  text "Round" at 154.68,13.994 h1.52
  text "Top Layer - Bottom Layer" at 173.319,13.994 h1.52
  text "Pad" at 211.407,13.994 h1.52
  text "Rounded" at 226.39,13.994 h1.52
  text "c260hn210m265" at 245.333,13.994 h1.52
  text "-" at 363.713,13.994 h1.52
  text "-" at 391.391,13.994 h1.52
  text "10" at 98.917,10.184 h1.52
  text "0.900mm (35.43mil)" at 113.899,10.184 h1.52
  text "PTH" at 141.831,10.184 h1.52
  text "Round" at 154.68,10.184 h1.52
  text "Top Layer - Bottom Layer" at 173.319,10.184 h1.52
  text "Pad" at 211.407,10.184 h1.52
  text "(Mixed)" at 226.39,10.184 h1.52
  text "(Mixed)" at 245.333,10.184 h1.52
  text "-" at 363.713,10.184 h1.52
  text "-" at 391.391,10.184 h1.52
  text "10" at 98.917,6.374 h1.52
  text "1.000mm (39.37mil)" at 113.899,6.374 h1.52
  text "PTH" at 141.831,6.374 h1.52
  text "Round" at 154.68,6.374 h1.52
  text "Top Layer - Bottom Layer" at 173.319,6.374 h1.52
  text "Pad" at 211.407,6.374 h1.52
  text "(Mixed)" at 226.39,6.374 h1.52
  text "(Mixed)" at 245.333,6.374 h1.52
  text "-" at 363.713,6.374 h1.52
  text "-" at 391.391,6.374 h1.52
  text "160" at 98.917,2.564 h1.52
  text "0.300mm (11.81mil)" at 113.899,2.564 h1.52
  text "PTH" at 141.831,2.564 h1.52
  text "Round" at 154.68,2.564 h1.52
  text "Top Layer - Bottom Layer" at 173.319,2.564 h1.52
  text "(Mixed)" at 211.407,2.564 h1.52
  text "Rounded" at 226.39,2.564 h1.52
  text "(Mixed)" at 245.333,2.564 h1.52
  text "-" at 363.713,2.564 h1.52
  text "-" at 391.391,2.564 h1.52
  text "189 Total" at 98.917,-1.246 h1.52
  text "Slot definitions :" at 86.068,-4.928 h1.52
  text "Routed Path Length" at 112.298,-4.928 h1.52
  text "= Calculated from tool start centre position to tool end centre position." at 140.306,-4.928 h1.52
  text "Hole Length" at 112.298,-7.468 h1.52
  text "= Routed Path Length + Tool Size = Slot length as defined in the PCB layout" at 129.895,-7.468 h1.52

## Text inside footprints (layer, text, board x,y; h text height)
J2: Bottom Overlay "Board Edge" at 31.076,-51.806 h0.71